# Altium PCB 0.PCB1.PcbDoc (part 7 of 12)
Units mm, origin at the board's own origin, x right, y up, seen from the top; angles counter-clockwise.
Board outline 77 x 72 mm, 6 copper layers (Top Layer, Layer 1, Layer 3, Layer 4, Layer 2, Bottom Layer), stack 1.538 mm thick; 570 components, 490 nets, 3331 pads, 1909 vias.
Unrouted connection lines stored in the file: 2.
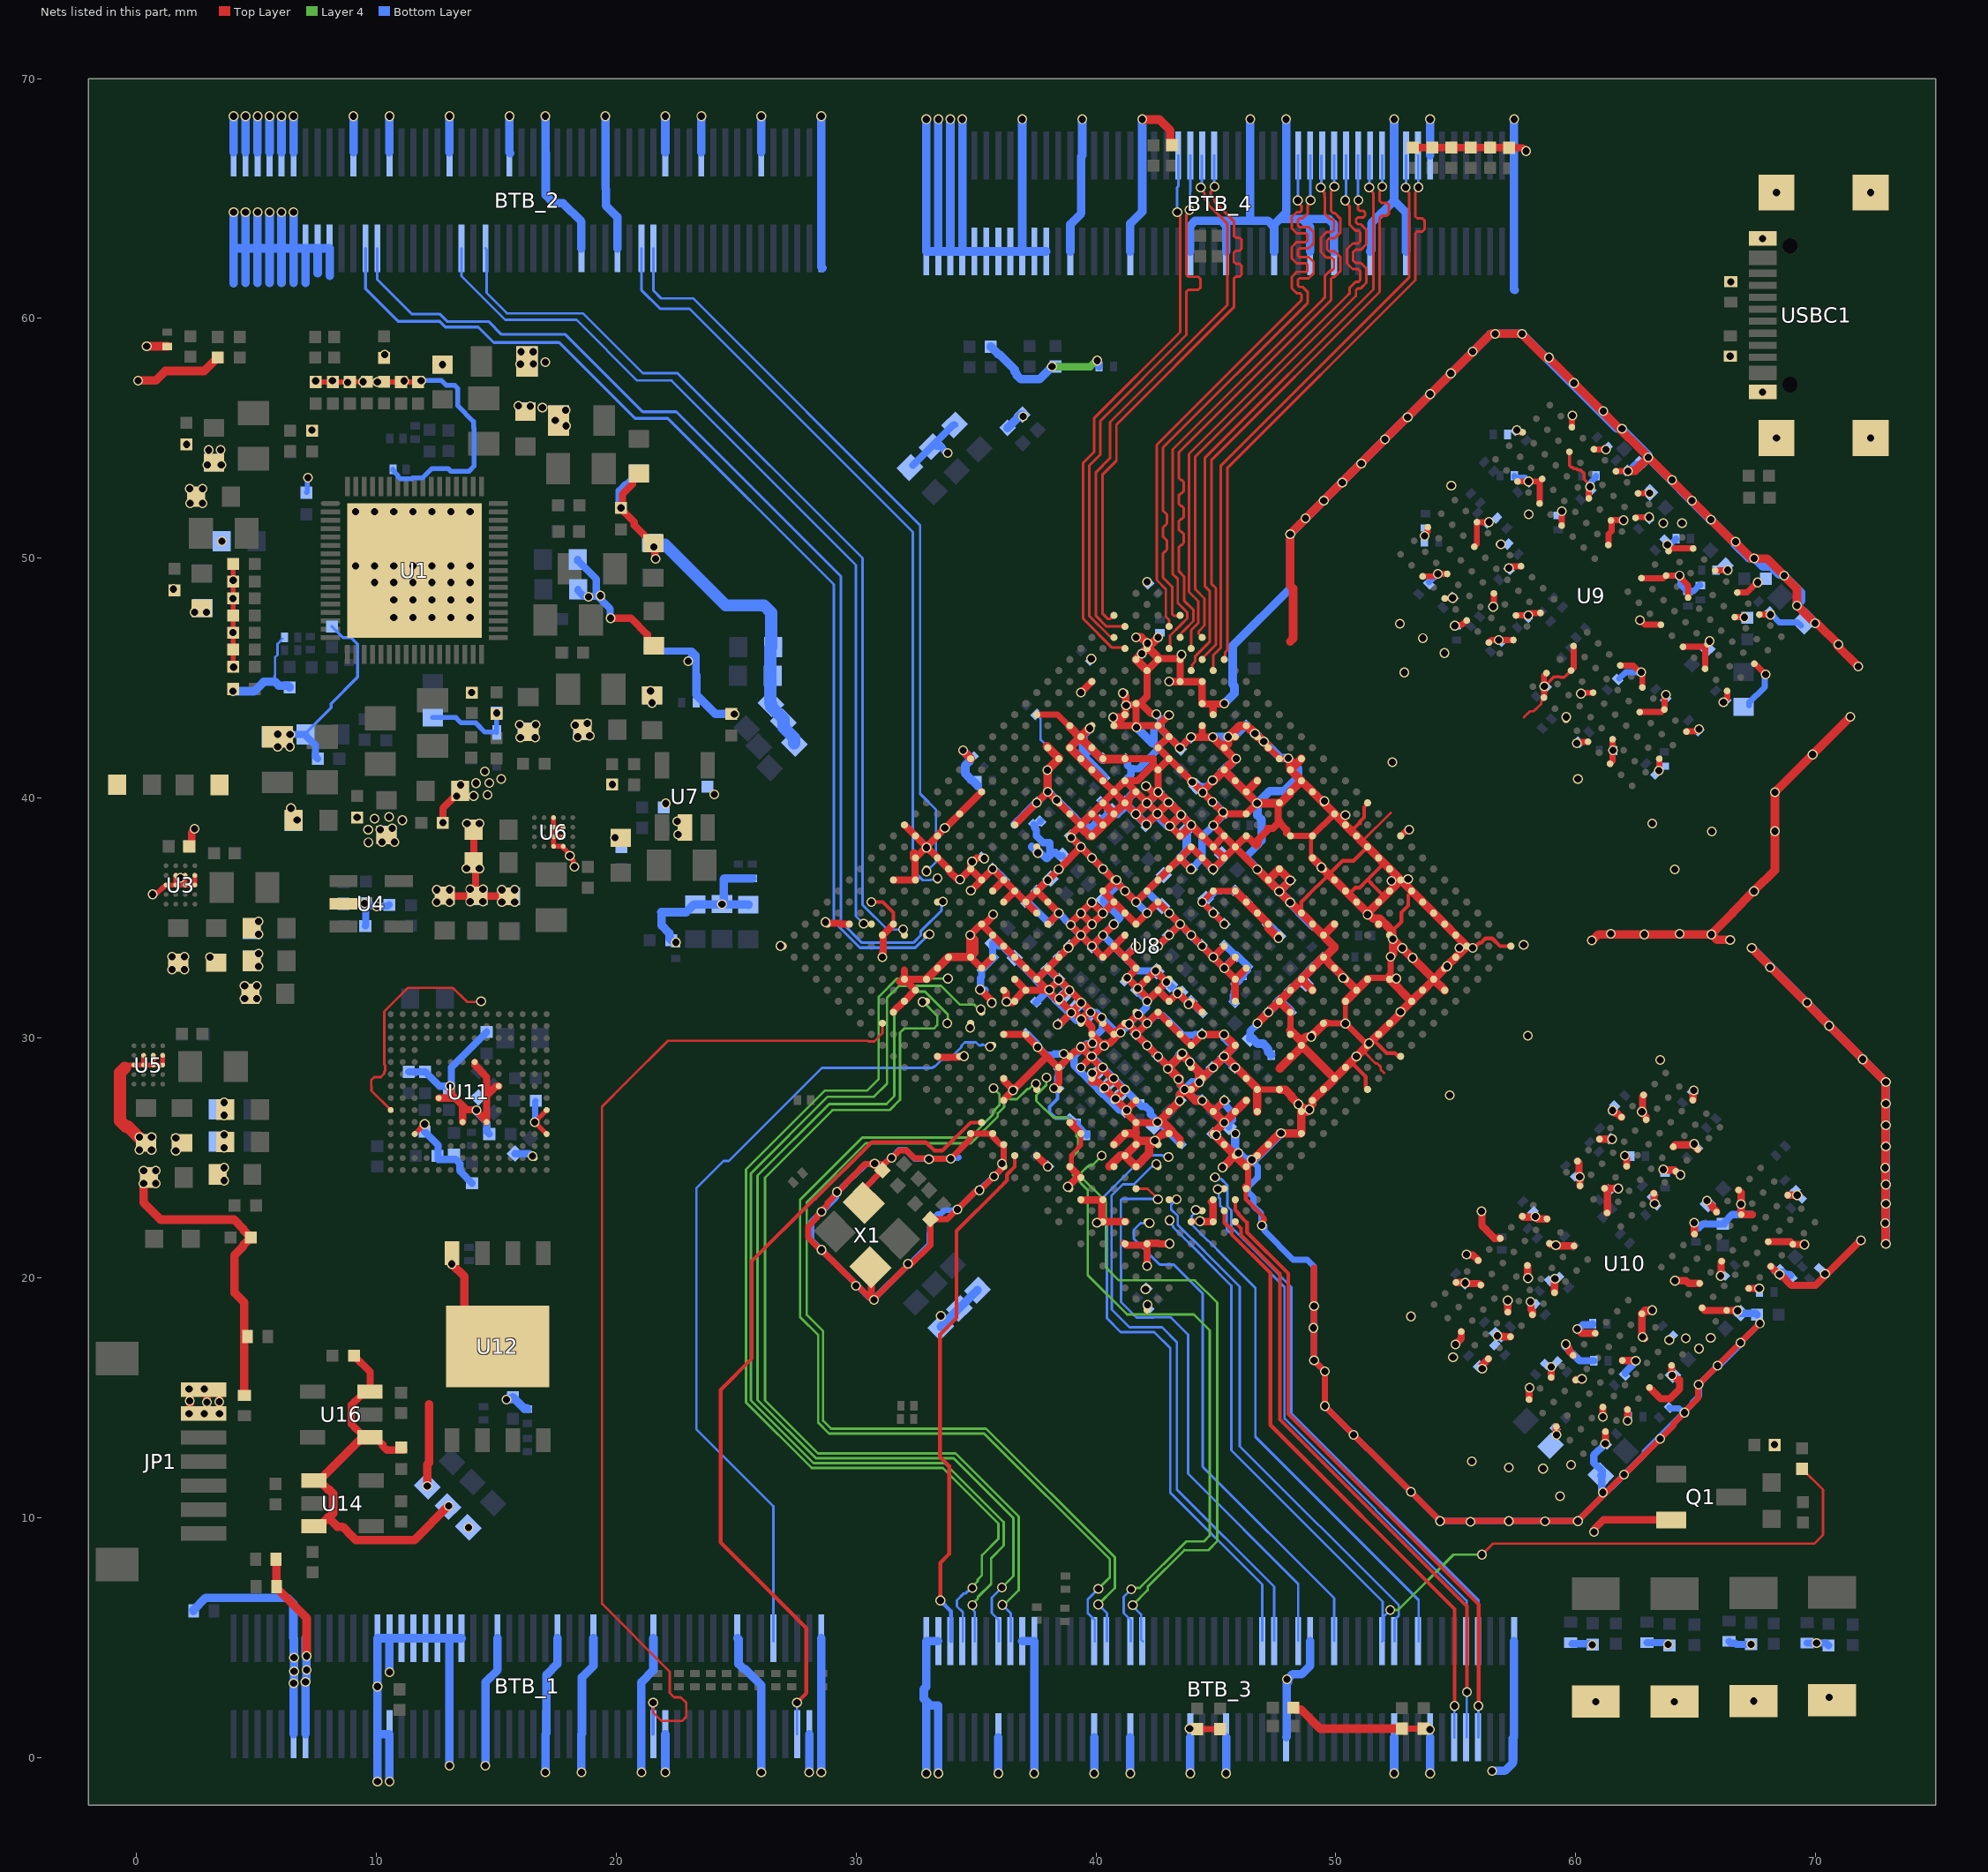
[diagram p11: the nets of this part, all layers, seen from the top]

## Via types
v1: diameter 0.41, hole 0.3, Top Layer to Bottom Layer, tented both sides, 1901 vias
v2: diameter 0.41, hole 0.3, Top Layer to Bottom Layer, 8 vias

## Nets (pads, with @x,y where several pads share a name; then routed paths per layer and width w, separated by ;. In a path a pad name is that pad's centre, name@x,y a point inside that pad or via, vN(x,y) a via of type N, cw(c..) or ccw(c..) an arc to the next point about the centre after c; other vN are vias at no path point) (continued)
GND: (continued)
  Bottom Layer w0.102: 5.765,45.066 5.778,45.079 5.778,45.866 5.879,45.967 5.879,46.431 R40.1@6.088,46.64 ; R54.2@37.501,43.491 37.695,43.297 37.695,42.428 38.318,41.806 38.318,41.499 v1(37.982,41.163)
  Bottom Layer w0.127: 5.765,45.066 5.773,45.058 5.773,44.857 ; C50.2@7.055,42.656 7.055,42.706 8.117,43.768 8.117,43.937 9.224,45.044 9.224,46.414 8.952,46.686 8.62,46.686 R13.1@8.161,47.145
  Bottom Layer w0.142: v1(38.254,27.901) 38.354,27.801 38.399,27.801 38.399,27.455 38.069,27.125 38.069,26.896 38.319,26.646 38.691,26.646 38.714,26.669 38.865,26.669 38.889,26.693 C179.1@38.949,26.634
  Bottom Layer w0.203: C64.1@7.095,52.733 7.122,52.76 7.122,53.326 v1(7.149,53.353) ; R42.1@10.697,53.712 10.697,53.662 10.893,53.465 10.893,53.427 11.012,53.308 11.481,53.308 11.513,53.341 11.922,53.341 12.321,53.739 12.999,53.739 13.113,53.625 13.858,53.625 14.084,53.851 14.084,55.418 14.056,55.446 14.056,55.699 13.387,56.368 13.387,57.085 13.268,57.204 12.925,57.204 12.712,57.417 v1@12.034,57.417 ; C61.2@12.352,43.353 13.319,43.353 13.535,43.137 14.15,43.137 14.535,42.753 15.004,42.753 U2.2@15.019,42.737 v1(15.019,43.545)
  Bottom Layer w0.254: v1(16.602,26.491) 16.624,26.512 16.624,27.358 C395.1@16.645,27.38 ; v1(28.565,22.747) 28.144,22.326 28.144,21.583 29.773,19.954 30.556,19.171 30.603,19.171 30.701,19.073 v1(30.754,19.073) 30.754,19.12 32.163,20.53 v1(32.163,20.577) ; v1@28.565,22.775 28.601,22.811 28.629,22.811 29.168,23.35 29.168,23.537 v1(29.206,23.574) ; v1@29.254,23.608 29.883,24.237 29.897,24.237 ; 29.903,24.255 29.915,24.255 30.39,24.73 30.746,24.73 v1(30.776,24.76) ; v1@30.754,24.737 31.177,24.737 31.442,25.002 v1(31.484,25.002) ; v1@31.494,25.04 31.531,25.077 31.551,25.077 31.795,25.322 32.074,25.322 32.434,24.962 33.018,24.962 v1(33.04,24.941) 33.052,24.953 33.941,24.953 33.979,24.991 34.251,24.991 34.277,25.017 ; v1@32.211,20.53 33.056,21.376 33.056,21.856 33.092,21.892 ; 33.09,21.893 33.09,22.353 33.239,22.502 33.261,22.502 33.403,22.644 33.516,22.644 33.689,22.817 34.199,22.817 v1(34.229,22.847) ; v1@34.23,22.846 34.999,23.615 35.118,23.615 v1(35.148,23.645) 35.732,24.229 v1(35.757,24.229) 36.05,24.522 36.05,24.725 v1(36.088,24.763) ; v1(38.17,57.986) 38.316,57.986 R63.1@38.323,57.993 ; v1(44.427,35.659) v1(44.886,35.2) v1(45.346,34.74) ; C149.1@44.585,35.8 44.691,35.8 45.005,36.113 45.21,36.113 ; 45.404,36.115 45.406,36.114 45.731,36.114 C209.1@45.766,36.149 45.789,36.172 45.821,36.172 C198.1@46.303,35.69 47.584,34.409 47.584,34.189 v1(47.614,34.159) ; v1(46.502,24.915) 46.502,24.873 46.751,24.624 46.751,24.189 46.344,23.782 46.344,23.572 46.563,23.354 46.563,23 46.889,22.674 46.889,22.215 v1(46.919,22.185) ; v1@47.019,22.165 47.019,21.959 48.229,20.75 48.813,20.75 49.092,20.47 v1(49.092,18.819) v1(49.092,16.559) v1(49.55,16.101) 49.55,14.647 v1(50.743,13.452) ; v1@50.764,13.435 51.946,12.253 51.95,12.253 v1(53.131,11.072) v1(54.35,9.853) v1(57.22,9.853) 58.71,9.853 v1(58.72,9.843) ; C334.1@53.893,48.994 v1(54.249,49.35) ; C329.1@57.444,53.439 57.444,53.389 57.467,53.366 57.878,53.366 C335.1@58.008,53.236 ; v1@58.719,9.853 v1(60.091,9.853) 62.871,12.633 62.871,12.735 64.511,14.375 v1(64.536,14.375) ; C299.1@60.599,53.058 60.622,53.058 60.636,53.073 60.636,53.178 60.848,53.389 C325.1@60.848,53.439 ; C302.1@61.818,44.981 62.082,45.246 v1(62.73,45.246) ; v1(62.176,53.634) 62.197,53.634 62.483,53.921 62.632,53.921 C297.1@62.681,53.871 ; v1(63.824,50.567) 63.854,50.597 63.959,50.597 64.112,50.75 64.162,50.75 64.185,50.773 C321.1@64.185,50.823 ; C350.1@63.91,14.586 63.945,14.551 64.317,14.551 64.464,14.405 v1@64.472,14.405 ; v1@64.358,49.223 64.365,49.216 64.365,48.881 64.638,48.609 C303.1@64.688,48.609 ; v1@64.536,14.4 64.866,14.73 64.866,14.781 65.145,15.06 v1@65.145,15.517 ; C303.1@64.739,48.613 64.757,48.632 64.915,48.632 65.146,48.863 C327.1@65.196,48.863 ; v1(65.122,15.541) v1@65.145,15.517 ; v1(65.915,16.335) 65.145,15.564 v1@65.145,15.517 ; v1@65.945,16.305 66.904,17.263 66.904,17.325 67.673,18.093 v1(67.674,18.093) ; C307.1@67.228,43.864 67.228,43.978 67.876,44.626 67.876,45.122 v1(67.914,45.159) ; v1(68.117,47.648) 68.17,47.648 68.489,47.329 69.249,47.329 C322.1@69.387,47.191
  Bottom Layer w0.305: C56.1@5.85,42.565 5.937,42.652 v1(6.408,42.652) ; C56.1@6.077,42.791 6.231,42.637 6.392,42.637 v1(6.408,42.652) ; C60.1@7.559,41.64 7.461,41.738 7.461,42.2 7.055,42.606 C50.2@7.055,42.656 7.053,42.654 6.41,42.654 v1(6.408,42.652) ; C78.1@8.633,35.59 8.643,35.599 9.278,35.599 9.287,35.609 ; 9.287,35.612 9.515,35.612 v1(9.515,35.609) ; R23.1@9.541,34.669 9.557,34.685 C77.1@9.557,35.6 ; C77.1@9.573,35.616 9.671,35.518 9.952,35.518 9.989,35.482 v1(10.017,35.482) 10.037,35.502 10.49,35.502 C80.1@10.538,35.551 ; C392.2@11.351,28.584 C390.2@12.037,28.584 12.632,27.989 13.133,27.989 13.133,28.774 C386.2@14.602,30.243 ; C391.2@12.019,26.091 12.581,25.529 12.581,24.936 13.306,24.936 13.484,24.758 13.484,24.487 13.506,24.464 13.506,24.425 R108.1@13.992,23.939 ; v1(14.178,26.978) 14.198,26.958 14.198,26.882 14.612,26.468 14.612,26.088 C389.2@14.71,25.991 ; C388.2@15.784,25.172 16.387,25.172 16.488,25.071 v1(16.517,25.071) ; C1.2@18.4,49.946 18.4,49.896 19.174,49.121 19.174,48.605 v1(19.341,48.438) ; C62.2@18.41,48.7 18.41,48.65 18.633,48.427 18.683,48.427 18.702,48.408 18.824,48.408 v1(18.844,48.388) ; v1@18.854,48.388 18.874,48.408 19.116,48.408 v1@19.244,48.536 ; v1@19.272,48.369 19.751,47.89 19.751,47.514 v1(19.765,47.5) ; v1(20.201,52.098) 20.201,52.126 20.13,52.197 20.13,52.812 20.399,53.081 20.451,53.081 20.815,53.444 C14.1@20.815,53.516 ; C69.1@21.573,46.351 21.795,46.128 23.151,46.128 ; v1(23.004,45.71) 23.004,45.739 23.151,45.885 23.151,46.128 ; 23.329,45.174 23.329,45.949 23.151,46.128 ; C106.1@32.372,53.869 34.065,55.563 C105.1@34.103,55.563 ; C104.1@33.357,54.669 33.361,54.673 33.503,54.673 33.792,54.384 v1(33.82,54.384) ; v1(35.174,32.013) 35.192,31.995 35.379,31.995 35.381,31.993 35.381,31.976 ; v1@35.174,32.07 35.194,32.09 35.194,32.502 35.234,32.542 C296.1@35.234,32.83 ; v1@35.199,32.039 v1@35.229,32.01 ; C296.1@35.266,32.866 C295.1@35.725,33.324 35.757,33.356 35.757,33.36 35.693,33.424 C164.1@35.693,33.944 35.831,33.944 35.95,33.825 36.098,33.825 C165.1@36.613,33.31 ; v1(35.696,37.038) 35.76,37.038 36.185,36.613 C244.1@36.188,36.613 ; C165.1@36.608,33.335 37.467,32.475 37.467,32.443 37.499,32.411 ; 36.61,38.87 36.586,38.895 36.586,38.898 36.999,39.312 ; 37.032,39.365 37.035,39.365 37.473,39.802 v1(37.537,39.802) 37.992,40.258 v1(37.994,40.258) 38.031,40.258 C219.1@38.415,39.874 ; C294.1@37.11,30.184 37.11,30.18 37.548,29.742 v1@37.548,29.613 ; 37.327,37.996 37.327,37.951 37.419,37.859 v1@37.56,37.859 ; C237.1@37.417,38.894 37.449,38.862 37.449,38.753 37.52,38.682 37.52,38.414 37.795,38.14 38.069,38.14 38.08,38.129 38.08,37.601 ; C242.2@37.496,36.154 C242.2@37.532,36.118 ; C241.1@37.506,31.478 v1@37.969,31.941 ; v1(37.568,29.613) 37.597,29.613 37.93,29.279 38.206,29.279 38.254,29.327 38.645,29.327 v1(38.656,29.339) ; v1(37.579,37.715) v1@37.643,37.779 ; v1@37.595,37.827 37.595,37.824 37.947,37.472 37.951,37.472 38.08,37.601 ; R55.2@37.688,39.038 R55.2@37.688,39.041 ; v1(37.991,36.577) C242.2@37.532,36.118 ; v1(38.059,32.009) 38.037,32.009 v1@37.969,31.941 ; v1(38.254,27.901) 38.254,27.929 38.399,28.074 38.399,28.376 38.434,28.411 38.434,28.702 C183.1@38.466,28.734 ; v1(38.361,39.907) 38.389,39.907 38.506,39.789 38.531,39.789 C220.1@38.947,39.373 39.418,38.902 39.418,38.728 39.438,38.707 ; v1(38.396,30.55) 38.475,30.55 38.918,30.992 39.189,30.72 39.34,30.72 39.383,30.764 v1(39.383,30.769) ; C129.1@38.602,37.59 38.464,37.59 38.324,37.73 38.209,37.73 38.08,37.601 ; v1(38.9,31.978) 38.884,31.978 C170.1@37.976,32.887 ; 38.908,29.224 38.903,29.219 39.089,29.219 ; v1@38.939,34.711 v1(39.83,33.82) 39.83,33.822 41.007,34.999 40.317,35.689 C127.1@40.317,35.773 40.871,36.326 C111.1@40.871,36.469 ; v1(38.947,34.712) 38.942,34.712 38.456,35.199 v1(38.451,35.199) 38.044,34.791 38.04,34.791 C166.1@38.027,34.805 37.172,35.659 37.142,35.659 37.11,35.691 37.106,35.691 C245.1@37.074,35.659 C242.2@37.532,36.118 ; v1(38.968,31.047) 38.948,31.067 38.842,31.067 37.98,31.93 v1@37.969,31.941 ; v1(38.973,38.352) 38.988,38.352 v1(39.376,37.964) v1(39.835,37.504) v1(40.295,37.044) C111.1@40.871,36.469 ; C277.1@39.217,26.439 39.219,26.437 39.219,26.342 39.582,25.979 39.616,25.979 39.618,25.976 C283.1@39.618,25.931 ; v1(39.371,34.281) C170.1@37.976,32.887 ; v1(39.38,29.617) v1@39.433,29.564 ; v1(39.385,31.461) 39.391,31.461 v1(39.784,31.068) ; v1@39.398,30.755 39.533,30.891 39.67,30.891 39.842,31.062 40.022,31.062 C169.1@40.288,30.796 ; v1(39.855,29.773) 39.835,29.753 39.622,29.753 v1@39.433,29.564 ; v1(40.054,58.242) 40.054,58.213 40.129,58.138 40.129,57.988 C230.2@40.131,57.986 ; C221.1@40.237,39.859 40.24,39.859 40.596,39.503 C108.1@40.596,39.469 ; v1(40.289,34.278) 41.197,33.37 ; v1(40.344,29.665) 40.323,29.685 40.049,29.685 39.982,29.753 39.861,29.753 39.844,29.769 39.875,29.8 39.875,29.973 40.268,30.365 40.268,30.776 C169.1@40.288,30.796 ; v1(40.871,36.582) C111.1@40.871,36.469 ; C223.1@41.205,40.71 41.205,40.714 41.465,40.974 C224.1@41.465,41.169 ; R57.2@41.278,41.637 41.31,41.605 41.31,41.374 C224.1@41.465,41.219 ; v1(41.282,26.989) 40.966,26.989 C181.1@39.754,28.201 39.089,28.866 39.089,29.219 ; v1@41.378,30.557 41.378,30.551 41.602,30.328 C135.1@41.602,30.166 ; C224.1@41.468,41.171 C224.1@41.465,41.169 ; v1(41.666,33.814) 41.642,33.814 41.197,33.37 ; v1(41.673,30.148) v1@43.051,28.77 ; v1(41.764,30.97) 41.764,30.967 41.378,30.582 41.378,30.559 v1(41.035,30.216) 41.015,30.236 40.848,30.236 C169.1@40.288,30.796 ; v1(42.133,35.206) v1(41.674,35.666) ; 42.413,42.276 42.413,42.859 42.592,43.037 42.594,43.037 42.722,43.165 ; v1(42.486,32.796) 42.466,32.776 42.388,32.776 42.367,32.796 41.774,32.796 41.671,32.9 C180.1@41.668,32.9 ; v1(42.486,32.796) 43.857,31.426 v1(43.857,31.408) ; v1(42.521,43.496) 42.521,43.468 42.722,43.267 42.722,43.165 ; v1(42.565,26.49) 42.565,26.518 42.272,26.811 42.272,26.944 42.079,27.137 41.916,27.137 41.668,27.385 C136.1@41.665,27.385 v1(41.205,27.844) v1(40.746,28.304) v1(39.827,29.223) 39.806,29.243 39.754,29.243 39.536,29.461 v1@39.433,29.564 ; v1(42.584,33.822) 42.59,33.822 v1(43.51,34.742) ; 42.59,42.099 42.562,42.071 42.562,42.004 42.166,41.607 C266.1@42.166,41.604 42.162,41.604 41.777,41.219 C224.1@41.465,41.219 ; C148.1@42.754,35.494 42.16,36.088 42.16,36.151 ; v1(42.937,32.328) 42.935,32.328 42.13,31.522 v1(42.128,31.522) ; v1@43.029,28.744 43.026,28.742 43.026,28.675 v1@43.45,28.251 ; v1(43.043,43.458) 43.015,43.458 42.722,43.165 ; v1(43.05,35.202) v1(43.51,34.742) ; v1(43.434,28.267) 43.434,28.239 43.511,28.162 43.511,28.033 v1(43.7,27.844) 43.72,27.824 43.755,27.824 44.125,27.453 C292.1@44.428,27.453 ; 43.504,37.493 43.049,37.038 43.047,37.038 42.16,36.151 ; 43.505,37.493 v1(43.965,37.034) 44.422,37.491 44.422,37.493 ; v1(43.962,42.539) 43.96,42.539 v1(43.505,42.084) 42.722,42.867 42.722,43.165 ; v1(43.969,38.872) 44.439,38.403 ; C124.1@44.003,31.561 44.035,31.529 44.035,31.445 C116.1@44.423,31.057 ; C274.1@44.192,40.484 44.635,40.484 44.856,40.705 C262.1@44.859,40.705 44.863,40.705 45.318,41.16 C263.1@45.341,41.16 ; v1(44.425,30.142) 44.134,30.142 44.102,30.11 43.612,30.11 43.545,30.177 C123.1@43.542,30.177 C113.1@43.082,30.637 42.781,30.938 42.464,30.938 v1(42.13,30.603) 41.778,30.956 42.108,31.286 42.108,31.502 v1(42.128,31.522) ; C216.1@44.918,39.765 44.95,39.733 45.007,39.733 C217.1@45.345,39.395 ; C193.1@45.228,37.614 45.348,37.494 44.888,37.033 v1(44.882,37.033) 44.422,37.493 ; v1(45.347,27.386) 45.347,27.238 45.689,26.897 45.689,26.574 45.538,26.423 C282.1@45.538,26.285 ; C217.1@45.379,39.361 45.38,39.357 44.887,38.864 v1(44.887,38.859) 44.887,38.851 44.439,38.403 ; C214.1@45.381,33.856 45.385,33.856 C213.1@45.767,33.474 ; C206.1@45.765,31.481 45.733,31.512 45.733,31.77 45.765,31.803 45.765,31.932 45.8,31.967 45.8,32.258 C205.1@45.832,32.29 45.864,32.322 45.902,32.322 46.146,32.566 C202.1@46.146,32.611 46.146,32.657 46.315,32.825 46.315,32.942 46.347,32.974 46.347,32.977 C191.1@46.315,33.009 45.85,33.474 C213.1@45.767,33.474 ; C201.1@46.427,29.968 46.427,30.27 46.73,30.573 v1(46.73,30.61) ; 46.73,38.047 46.73,38.019 46.325,37.614 46.325,37.509 46.305,37.489 47.644,36.15 v1(47.644,36.11) ; v1@59.557,17.143 60.167,16.533 C346.1@60.756,16.533 ; U17.1@59.842,4.741 60.662,4.741 C400.1@60.709,4.694 ; v1@60.065,17.879 60.136,17.879 60.292,18.035 60.703,18.035 60.705,18.037 C357.1@60.705,18.083 ; C366.1@61.051,11.753 61.087,11.718 61.087,11.131 61.132,11.086 v1(61.132,11.047) ; C366.1@61.107,11.733 61.107,11.936 60.751,12.291 60.751,12.594 v1(61.235,13.079) ; C369.1@62.072,16 62.072,16.062 62.504,16.494 v1(62.504,16.533) ; U20.1@62.97,4.788 63.783,4.788 C401.1@63.91,4.661 ; C363.1@65.135,22.093 65.283,22.241 C342.1@66.136,22.241 ; C342.1@66.212,22.248 66.212,22.317 66.529,22.634 67.355,22.634 ; U21.1@66.399,4.839 66.472,4.766 66.646,4.766 66.7,4.712 v1(67.313,4.712) ; v1(66.753,18.624) 66.759,18.624 66.868,18.516 67.506,18.516 C341.1@67.558,18.464 ; v1(68.498,20.14) 68.586,20.228 68.648,20.228 68.736,20.14 68.904,20.14 C384.1@68.955,20.089 ; U22.1@69.65,4.769 v1(70.041,4.769) 70.431,4.769 C403.1@70.539,4.661 ; 37.499,32.411 v1@37.969,31.941 ; 37.499,32.411 37.5,32.411 C170.1@37.976,32.887 ; 39.089,29.219 v1@39.433,29.564 ; C111.1@40.871,36.469 v1(41.214,36.125) v1(41.674,35.666) ; 41.197,33.37 C180.1@41.668,32.9 ; C224.1@41.465,41.169 C224.1@41.465,41.219 ; C180.1@41.668,32.9 41.683,32.884 41.683,32.881 v1(41.303,32.501) 41.677,32.127 41.677,32.002 42.128,31.55 v1(42.128,31.522) ; v1@41.674,35.666 42.16,36.151 ; v1(43.51,34.742) 43.963,34.289 v1(44.889,33.363) v1(45.349,32.904) 45.349,32.932 45.767,33.351 C213.1@45.767,33.474 ; 44.422,37.493 44.422,38.387 44.439,38.403
  Bottom Layer w0.356: U23.1@2.383,6.101 2.383,6.151 2.888,6.656 6.295,6.656 6.547,6.404 6.547,4.973 BTB_1.6@6.551,4.97 6.564,4.956 BTB_1.6@6.564,4.149 ; v1(4.031,44.458) 4.922,44.458 5.313,44.849 5.765,44.849 5.773,44.857 5.939,44.691 6.311,44.691 R15.1@6.383,44.619 ; v1(4.051,64.431) BTB_2.100@4.051,62.92 ; BTB_2.1@4.051,66.92 v1(4.051,68.431) ; 4.058,61.468 4.051,61.476 BTB_2.100@4.051,62.92 ; 4.551,61.476 BTB_2.99@4.551,62.92 ; v1(4.551,64.431) BTB_2.99@4.551,62.92 ; BTB_2.2@4.551,66.92 v1(4.551,68.431) ; 5.051,61.476 BTB_2.98@5.051,62.92 ; v1(5.051,64.431) BTB_2.98@5.051,62.92 ; BTB_2.3@5.051,66.92 v1(5.051,68.431) ; 5.551,61.476 BTB_2.97@5.551,62.92 ; v1(5.551,64.431) BTB_2.97@5.551,62.92 ; BTB_2.4@5.551,66.92 v1(5.551,68.431) ; 6.051,61.476 BTB_2.96@6.051,62.92 ; v1(6.051,64.431) BTB_2.96@6.051,62.92 ; BTB_2.5@6.051,66.92 v1(6.051,68.431) ; BTB_1.95@6.551,0.97 6.552,0.971 6.552,3.093 v1(6.554,3.094) ; 6.551,61.476 BTB_2.95@6.551,62.92 ; v1(6.551,64.431) BTB_2.95@6.551,62.92 ; BTB_2.6@6.551,66.92 v1(6.551,68.431) ; v1@6.556,3.102 6.568,3.114 v1@6.568,3.594 ; BTB_1.6@6.567,4.147 6.567,3.602 v1(6.574,3.595) ; BTB_1.94@7.051,0.97 7.051,3.159 7.086,3.194 7.086,3.632 v1(7.096,3.643) 7.086,3.653 7.086,4.19 7.051,4.224 BTB_1.7@7.051,4.97 ; 7.051,61.476 BTB_2.94@7.051,62.92 ; 7.558,61.887 7.558,62.913 BTB_2.93@7.551,62.92 ; 8.064,61.773 8.064,62.907 BTB_2.92@8.051,62.92 BTB_2.93@7.551,62.92 ; BTB_2.11@9.051,66.92 v1(9.051,68.431) ; v1(10.051,-1.01) BTB_1.88@10.051,0.97 ; v1(10.551,-1.007) BTB_1.87@10.551,0.97 BTB_1.88@10.051,0.97 ; v1(10.551,3.549) BTB_1.14@10.551,4.97 ; BTB_2.14@10.551,66.92 v1(10.551,68.431) ; v1(13.051,-0.344) BTB_1.19@13.051,4.97 ; BTB_2.19@13.051,66.92 v1(13.051,68.431) ; BTB_1.20@13.551,4.97 BTB_1.19@13.051,4.97 ; v1(14.551,-0.344) 14.551,3.132 15.051,3.632 BTB_1.23@15.051,4.97 ; v1(15.422,14.92) 15.437,14.92 15.465,14.948 15.619,14.948 C397.1@15.691,15.02 16.162,14.55 16.279,14.55 16.301,14.527 C396.1@16.301,14.522 ; v1(15.551,68.431) BTB_2.24@15.551,66.92 BTB_2.24@15.582,66.889 ; v1(17.051,-0.618) BTB_1.74@17.051,0.97 17.093,1.012 17.093,3.44 17.551,3.897 BTB_1.28@17.551,4.97 ; v1(17.051,68.431) BTB_2.27@17.051,66.92 17.063,66.908 17.063,65.141 17.401,64.803 17.784,64.803 18.551,64.036 BTB_2.71@18.551,62.92 ; v1(18.551,-0.618) BTB_1.71@18.551,0.97 18.574,0.992 18.574,3.337 19.051,3.815 BTB_1.31@19.051,4.97 ; v1(19.551,68.431) 19.551,65.411 19.571,65.391 19.571,64.706 20.051,64.226 BTB_2.68@20.051,62.92 ; v1(21.051,-0.618) BTB_1.66@21.051,0.97 21.051,3.137 21.551,3.637 BTB_1.36@21.551,4.97 ; v1(22.051,-0.618) BTB_1.64@22.051,0.97 ; BTB_2.37@22.051,66.92 v1(22.051,68.431) ; C279.1@22.292,34.075 22.22,34.147 22.22,34.365 21.897,34.687 21.891,34.687 21.888,34.691 21.888,35.235 21.884,35.238 22.922,35.238 23.251,35.568 C161.1@23.301,35.568 23.308,35.561 25.504,35.561 C163.1@25.511,35.554 ; 23.342,45.131 23.342,44.303 24.142,43.503 v1(24.926,43.503) ; BTB_2.40@23.551,66.92 v1(23.551,68.431) ; v1(24.414,35.577) 24.486,35.648 24.486,36.625 24.51,36.649 25.682,36.649 C264.1@25.684,36.651 ; BTB_1.43@25.051,4.97 25.104,4.917 25.104,3.897 25.31,3.69 25.359,3.69 26.051,2.999 BTB_1.56@26.051,0.97 v1(26.051,-0.618) ; BTB_2.45@26.051,66.92 v1(26.051,68.431) ; v1(28.051,-0.618) BTB_1.52@28.051,0.97 ; v1(28.551,-0.618) BTB_1.51@28.551,0.97 BTB_1.50@28.551,4.97 ; v1(28.551,68.431) BTB_2.50@28.551,66.92 BTB_2.51@28.551,62.92 28.551,62.151 BTB_2.51@28.604,62.098 ; v1(32.931,-0.668) BTB_3.100@32.931,0.843 32.931,2.343 ; v1(32.931,68.304) BTB_4.1@32.931,66.793 BTB_4.100@32.931,62.793 BTB_4.99@33.431,62.793 ; v1(33.431,-0.668) BTB_3.99@33.431,0.843 33.431,2.16 33.113,2.16 32.931,2.343 ; BTB_3.2@33.431,4.843 BTB_3.1@32.931,4.843 32.931,2.946 32.83,2.845 32.83,2.444 32.931,2.343 ; v1(33.431,68.304) BTB_4.2@33.431,66.793 BTB_4.99@33.431,62.793 ; C141.1@33.531,17.944 33.531,17.95 35.056,19.475 C143.1@35.056,19.48 ; v1(33.931,68.304) BTB_4.3@33.931,66.793 BTB_4.98@33.931,62.793 ; v1(34.431,68.304) BTB_4.4@34.431,66.793 BTB_4.97@34.431,62.793 ; v1(34.461,41.986) 34.461,41.971 34.719,41.713 34.719,41.527 34.553,41.362 34.553,41.023 35.084,40.493 ; R17.1@35.614,58.82 35.935,58.499 35.98,58.499 36.613,57.866 36.613,57.775 36.701,57.687 36.701,57.627 36.865,57.463 37.648,57.463 v1(38.17,57.986) ; v1(35.931,-0.668) BTB_3.94@35.931,0.843 ; C257.1@36.318,55.437 36.849,55.967 36.918,55.967 v1(36.966,55.918) ; BTB_4.93@36.484,62.793 BTB_4.92@36.931,62.793 ; C267.1@36.927,55.985 C267.1@36.933,55.985 ; BTB_3.9@36.931,4.843 BTB_3.10@37.431,4.843 BTB_3.91@37.431,0.843 v1(37.431,-0.668) ; v1(36.931,68.304) BTB_4.9@36.931,66.793 BTB_4.92@36.931,62.793 ; BTB_4.90@37.931,62.793 BTB_4.91@37.431,62.793 BTB_4.92@36.931,62.793 ; BTB_4.88@38.931,62.793 38.931,63.92 39.39,64.379 39.39,66.752 BTB_4.14@39.431,66.793 v1(39.431,68.304) ; 39.519,38.756 39.817,38.756 40.061,39 C107.1@40.164,39 40.189,39 40.608,39.419 40.608,39.458 C108.1@40.596,39.469 ; v1(39.748,42.902) 39.748,42.887 39.469,42.609 39.469,41.768 ; v1(39.931,-0.668) BTB_3.86@39.931,0.843 ; C222.1@40.264,41.607 39.804,42.067 39.783,42.067 39.484,41.768 39.469,41.768 ; C228.1@40.337,40.9 39.469,41.768 ; C108.1@40.69,39.339 40.695,39.335 40.888,39.335 41.155,39.602 41.155,39.623 41.239,39.706 ; C229.1@41.142,39.8 41.236,39.706 41.239,39.706 ; v1(41.431,-0.668) BTB_3.83@41.431,0.843 ; BTB_4.83@41.431,62.793 41.431,63.951 41.931,64.451 BTB_4.19@41.931,66.793 v1(41.931,68.304) ; 41.528,40.176 41.528,40.162 41.266,39.9 41.266,39.733 ; v1(41.697,42.95) 42.371,42.276 42.413,42.276 ; v1(42.563,39.352) v1@42.517,39.306 ; v1(42.565,26.49) 42.575,26.48 42.659,26.48 C285.1@43.089,26.049 C278.1@43.546,25.592 ; v1(42.993,28.711) 42.993,28.726 43.394,29.127 43.394,29.149 C145.1@43.473,29.229 ; C145.1@43.473,29.26 C145.1@43.477,29.256 ; C145.1@43.473,29.29 43.536,29.353 43.614,29.353 43.664,29.302 43.664,29.247 v1@43.93,28.98 ; v1(43.499,27.379) 43.499,27.628 43.7,27.829 v1(43.7,27.844) 43.715,27.844 44.01,28.139 44.277,28.139 44.286,28.148 44.286,28.166 44.463,28.343 ; 43.505,37.493 43.505,37.508 43.791,37.793 C256.1@43.791,38.691 ; v1(43.546,39.296) v1(43.082,38.833) 43.072,38.843 42.979,38.843 v1@42.517,39.306 ; v1(43.923,28.976) 43.923,28.964 44.463,28.424 44.463,28.343 ; v1(43.931,-0.668) BTB_3.78@43.931,0.843 ; BTB_4.78@43.931,62.793 43.931,63.864 44.139,64.073 45.222,64.073 ; v1(43.969,38.872) v1(43.026,39.815) v1(42.591,40.251) 41.671,39.332 v1(41.667,39.332) ; v1(44.88,42.538) 44.887,42.545 45.506,42.545 45.524,42.563 45.753,42.563 C239.1@46.231,43.042 46.262,43.042 46.6,42.705 46.622,42.705 v1(46.632,42.694) ; v1(45.343,30.137) 45.353,30.127 45.353,30.011 45.737,29.627 45.737,29.612 45.732,29.612 44.463,28.343 ; v1(45.345,29.222) v1(45.804,28.763) ; v1(45.347,43.938) 45.773,44.364 45.773,44.666 45.702,44.737 45.702,46.343 48.102,48.743 v1(48.102,51.001) v1(49.499,52.398) 56.44,59.34 56.631,59.34 v1(56.649,59.358) v1(57.767,59.358) 61.711,55.413 61.914,55.413 v1(61.932,55.395) 63.006,54.321 63.006,54.219 v1(63.024,54.201) 65.628,51.598 65.653,51.598 66.554,50.697 66.658,50.697 v1(66.668,50.687) ; v1(45.431,-0.668) BTB_3.75@45.431,0.843 ; BTB_4.75@45.431,62.793 45.431,63.864 45.222,64.073 ; v1(45.809,26.011) 45.799,26.001 45.799,25.363 45.945,25.217 v1(45.945,25.202) 45.96,25.202 46.236,24.926 46.491,24.926 v1(46.502,24.915) 46.512,24.926 46.619,24.926 v1(47.716,26.023) ; v1(45.851,41.639) 45.837,41.639 45.566,41.368 45.527,41.368 45.341,41.183 45.341,41.16 45.762,40.739 45.765,40.739 45.765,40.738 v1(46.72,39.781) v1(46.72,39.781) ; C201.1@46.427,29.968 46.529,29.968 46.739,29.758 46.974,29.758 47.131,29.601 47.131,29.576 47.187,29.521 47.187,29.408 47.307,29.289 C204.1@47.312,29.289 ; v1(46.431,68.304) BTB_4.28@46.431,66.793 46.431,64.103 46.401,64.073 ; v1@46.649,42.688 46.653,42.688 46.985,42.355 v1(46.999,42.355) 47.683,41.672 48.005,41.672 v1(48.015,41.661) 48.015,41.647 48.424,41.238 48.424,40.871 47.848,40.295 47.249,40.295 46.735,39.781 v1(46.72,39.781) ; 46.73,38.047 46.73,38.062 46.905,38.237 46.905,39.106 46.73,39.281 46.73,39.771 v1(46.72,39.781) ; v1(47.187,31.065) 47.609,31.487 47.609,31.52 47.613,31.524 47.613,31.555 C187.1@47.609,31.559 ; BTB_4.71@47.431,62.793 47.431,63.919 ; BTB_3.70@47.931,0.843 47.957,0.869 47.957,3.094 48.003,3.14 v1@48.003,3.264 ; v1(47.931,68.304) BTB_4.31@47.931,66.793 47.931,64.419 47.654,64.143 ; v1(47.967,3.262) 47.97,3.264 v1@48.003,3.264 ; v1(48.102,36.569) v1(48.102,36.569) v1(47.644,36.11) 47.656,36.11 48.104,35.663 v1(48.104,35.651) 48.104,35.611 48.471,35.243 48.471,35.219 C199.1@48.99,34.701 ; C192.1@48.139,31.099 47.714,31.524 47.645,31.524 49.478,33.357 C190.1@49.485,33.357 ; BTB_3.33@48.931,4.843 48.931,3.822 48.581,3.473 48.211,3.473 v1@48.003,3.264 ; BTB_4.68@48.931,62.793 48.931,63.813 48.602,64.143 ; BTB_4.66@49.931,62.793 49.921,62.803 49.921,63.934 49.713,64.143 48.602,64.143 ; BTB_4.63@51.431,62.793 51.484,62.846 51.484,63.964 52.431,64.911 ; v1(52.431,-0.668) BTB_3.61@52.431,0.843 ; v1(52.431,68.304) BTB_4.40@52.431,66.793 52.431,64.911 ; BTB_4.60@52.931,62.793 52.931,64.411 52.431,64.911 ; v1(53.931,-0.668) BTB_3.58@53.931,0.843 ; BTB_4.43@53.931,66.793 v1(53.931,68.304) ; v1(56.519,-0.564) 57.045,-0.564 57.378,-0.23 57.378,0.79 BTB_3.51@57.431,0.843 BTB_3.50@57.431,4.843 ; v1(57.431,68.304) 57.431,66.056 BTB_4.51@57.431,62.793 57.431,61.207 57.459,61.179 ; v1@66.603,50.622 67.215,50.011 67.417,50.011 v1(67.435,49.993) 67.46,49.993 67.807,49.647 68.153,49.647 68.477,49.323 68.64,49.323 69.389,48.573 69.389,48.222 69.222,48.055 v1(69.222,48.029) 69.235,48.029 C322.1@69.978,47.286 ; v1(67.342,33.754) v1(72.93,28.166) v1(72.93,27.265) v1(72.93,26.363) v1(72.93,25.474) v1(72.93,23.887) v1(72.93,23.086) v1(72.93,21.41) ; v1@71.775,45.489 v1(71.787,45.489) ; BTB_2.100@4.051,62.92 BTB_2.99@4.551,62.92 ; BTB_2.99@4.551,62.92 BTB_2.98@5.051,62.92 ; BTB_2.98@5.051,62.92 BTB_2.97@5.551,62.92 ; BTB_2.97@5.551,62.92 BTB_2.96@6.051,62.92 ; BTB_2.96@6.051,62.92 BTB_2.95@6.551,62.92 ; BTB_2.95@6.551,62.92 BTB_2.94@7.051,62.92 ; BTB_2.94@7.051,62.92 BTB_2.93@7.551,62.92 ; BTB_1.88@10.051,0.97 v1(10.051,2.956) BTB_1.13@10.051,4.97 BTB_1.14@10.551,4.97 ; BTB_1.14@10.551,4.97 BTB_1.15@11.051,4.97 BTB_1.18@12.551,4.97 BTB_1.19@13.051,4.97 ; BTB_4.99@33.431,62.793 BTB_4.98@33.931,62.793 ; BTB_4.98@33.931,62.793 BTB_4.97@34.431,62.793 ; BTB_4.97@34.431,62.793 BTB_4.95@35.431,62.793 BTB_4.94@35.931,62.793 BTB_4.92@36.931,62.793 ; 41.239,39.706 41.266,39.733 ; 41.266,39.733 v1(41.667,39.332) ; v1(41.667,39.332) v1(42.105,38.894) v1@42.517,39.306 ; 45.222,64.073 46.401,64.073 ; 46.401,64.073 47.172,64.073 47.378,63.866 47.654,64.143 ; 47.654,64.143 48.602,64.143
  Bottom Layer w0.508: v1(21.577,50.473) C6.1@21.577,50.563 ; C159.1@27.423,42.281 27.423,42.502 26.974,42.951 C158.1@26.974,43.172 26.974,43.295 26.461,43.809 C160.1@26.461,43.932 26.425,43.967 26.425,45.09 26.436,45.101 26.43,45.106 26.43,46.262 26.461,46.292 26.461,47.736 26.163,48.033 24.57,48.033 22.04,50.563 C6.1@21.577,50.563 ; C6.1@21.577,50.563 C6.1@21.496,50.643 C6.1@21.577,50.563
  other v1: 60.839,2.324 64.115,2.324 67.417,2.349 70.567,2.503 7.051,3.145 6.573,4.154 60.687,4.69 63.859,4.705 13.842,9.589 55.62,9.828 59.354,10.894 62.014,11.793 58.643,12.037 57.22,12.088 59.811,12.19 55.671,12.342 63.529,13.285 2.196,14.325 2.831,14.325 3.466,14.325 49.55,14.654 2.946,14.812 3.456,14.825 2.227,14.857 2.196,15.361 2.831,15.361 54.889,16.684 65.145,17.041 66.872,17.295 64.586,17.473 65.628,17.498 49.067,17.905 53.131,18.387 33.537,18.405 42.154,18.872 42.071,19.52 29.992,19.657 70.39,20.165 42.13,20.496 43.074,21.417 71.889,21.562 72.905,22.274 0.807,23.925 3.652,24.052 64.364,24.286 0.299,24.458 0.807,24.458 3.652,24.585 72.905,24.585 33.954,24.966 1.645,25.296 0.121,25.322 0.629,25.322 3.652,25.423 61.513,25.779 1.645,25.83 0.629,25.855 3.652,25.957 45.35,26.471 3.652,26.769 48.897,27.01 3.652,27.303 54.757,27.608 39.842,28.527 39.373,28.77 44.886,28.764 63.52,29.081 71.965,29.106 42.592,29.229 42.132,29.689 58,30.087 34.758,30.426 70.568,30.503 69.654,31.468 4.514,31.632 5.022,31.632 4.514,32.166 5.022,32.166 52.522,32.476 50.299,32.5 1.491,32.852 1.999,32.852 68.104,32.942 5.091,32.979 3.066,33.36 31.097,33.36 53.203,33.338 1.491,33.385 1.999,33.385 5.091,33.512 38.852,33.76 52.771,33.745 55.154,33.758 26.846,33.835 57.83,33.881 22.488,33.98 43.053,34.287 5.091,34.325 61.462,34.339 64.332,34.339 5.091,34.858 51.323,35.142 12.516,35.659 13.05,35.659 15.234,35.659 15.768,35.659 13.913,35.685 14.447,35.685 34.785,36.139 12.516,36.167 13.05,36.167 15.234,36.167 15.768,36.167 13.913,36.193 14.447,36.193 52.318,36.548 34.33,36.599 53.011,36.622 1.836,36.673 64.129,37.031 13.761,37.056 14.294,37.056 34.843,37.347 18.066,37.593 32.938,37.938 9.672,38.154 10.244,38.16 10.752,38.16 19.947,38.347 22.582,38.484 65.679,38.606 9.665,38.682 10.165,38.686 10.662,38.735 13.783,38.936 14.294,38.936 63.189,38.936 22.541,39.026 6.7,39.086 11.081,39.078 9.928,39.137 9.203,39.191 10.538,39.22 50.4,39.29 45.301,39.422 6.446,39.571 22.064,39.774 42.124,39.791 44.851,39.835 49.524,39.876 14.056,40.089 14.637,40.13 24.092,40.153 44.444,40.237 13.514,40.547 19.84,40.564 14.165,40.62 14.706,40.633 44.018,40.661 44.866,40.742 15.206,40.8 60.091,40.79 14.523,41.113 52.356,41.489 5.893,42.139 6.392,42.147 16.01,42.529 16.62,42.529 18.4,42.552 18.898,42.604 5.892,42.662 15.985,43.062 16.645,43.062 18.295,43.041 18.79,43.112 21.502,43.968 13.978,44.395 21.434,44.463 52.852,45.235 4.051,45.459 39.809,45.806 43.574,45.974 41.908,46.013 54.528,46.048 53.625,46.669 4.031,46.898 52.674,47.267 10.727,47.533 11.523,47.533 12.319,47.533 13.114,47.533 13.91,47.533 2.421,47.746 2.925,47.746 10.727,48.261 11.523,48.261 12.319,48.261 13.114,48.261 13.91,48.261 4.031,48.32 1.538,48.711 9.931,48.989 10.727,48.989 11.523,48.989 12.319,48.989 13.114,48.989 13.91,48.989 42.133,49.02 9.135,49.673 9.931,49.673 10.727,49.673 11.523,49.673 12.319,49.673 13.114,49.673 13.91,49.673 3.562,50.708 63.647,51.465 64.433,51.457 65.641,51.611 58.041,51.834 9.135,51.938 9.931,51.938 10.727,51.938 11.523,51.938 12.319,51.938 13.114,51.938 13.91,51.938 2.243,52.29 2.751,52.29 64.853,52.398 2.218,52.899 2.751,52.896 54.814,53.027 50.274,53.16 64.015,53.262 2.954,53.893 3.535,53.893 51.061,53.947 3.014,54.506 3.514,54.517 2.091,54.746 52.052,54.963 68.371,55.01 72.301,55.01 7.323,55.342 17.914,55.517 17.459,55.753 52.991,55.878 61.145,56.132 17.899,56.178 16.926,56.284 16.42,56.332 15.921,56.359 53.931,56.843 67.796,56.93 59.926,57.3 8.804,57.324 8.173,57.399 11.167,57.393 54.795,57.707 12.759,58.076 16.006,58.095 16.545,58.103 17.043,58.179 58.884,58.367 66.441,58.424 10.353,58.484 16.035,58.607 16.542,58.606 55.709,58.621 66.466,61.529 67.796,63.33 68.371,65.25 72.301,65.25
GPIO0_A0: BTB_3.3 U8.P33 | length 22
  Top Layer w0.156: v1@33.501,6.555 33.518,6.572 33.518,8.115 33.88,8.478 33.88,12.149 33.499,12.53 33.499,17.628 34.19,18.319 34.19,21.95 35.974,23.734 36.295,24.056 36.295,24.306 36.615,24.626 U8.P33@36.615,25.093
  Bottom Layer w0.156: v1(33.518,6.539) 33.955,6.101 BTB_3.3@33.955,4.843
GPIO0_B2: BTB_3.19 U8.K29 | length 27.1
  Layer 4 w0.102: v1(40.242,25.087) 40.242,25.071 39.856,24.684 39.706,24.684 39.643,24.622 39.634,24.622 39.395,24.383 39.395,24.189 40.416,23.169 40.416,20.428 40.953,19.891 44.127,19.891 45.059,18.959 45.059,9.012 44.686,8.639 43.695,8.639 ; v1(41.535,6.348) 42.158,6.971 42.158,7.111 43.69,8.643
  Bottom Layer w0.102: v1(41.535,6.348) 41.517,6.329 41.881,5.965 41.881,4.917 BTB_3.19@41.955,4.843
GPIO0_B7: BTB_3.18 U8.T28 | length 31.1
  Layer 4 w0.102: v1(37.939,28.346) 37.927,28.335 37.927,28.022 37.516,27.61 37.516,27.377 37.871,27.021 37.879,27.021 38.235,26.666 38.842,26.666 39.186,26.322 39.186,25.892 39.255,25.824 39.255,25.276 39.035,25.057 39.035,24.516 39.037,24.515 39.037,24.275 39.659,23.653 39.659,20.11 41.3,18.469 43.027,18.469 44.084,18.469 44.744,17.808 44.744,9.246 44.503,9.005 43.764,9.005 41.827,7.067 41.531,7.067 v1(41.472,7.008)
  Bottom Layer w0.102: BTB_3.18@41.455,4.843 41.455,5.718 41.158,6.014 41.158,6.694 v1(41.472,7.008)
GPIO0_C6: BTB_3.16 U8.T29 | length 39.7
  Layer 4 w0.102: v1(37.5,28.086) 37.425,28.086 37.21,27.871 37.138,27.871 36.706,27.439 36.433,27.439 36.41,27.462 36.232,27.462 36.172,27.402 36.172,27.113 35.91,26.851 35.91,26.725 34.786,25.601 34.106,25.601 30.398,25.601 27.947,23.15 27.947,18.451 28.629,17.769 28.629,14.038 28.958,13.709 35.421,13.709 40.787,8.343 40.787,7.059 v1(40.101,6.373)
  Bottom Layer w0.102: v1(40.101,6.373) 40.455,6.019 BTB_3.16@40.455,4.843
GPIO0_C7: BTB_3.15 U8.V31 | length 38.9
  Layer 4 w0.102: v1(35.732,27.907) 35.732,27.904 35.979,27.656 35.979,27.193 35.704,26.918 35.704,26.792 34.754,25.842 33.865,25.842 30.261,25.842 27.668,23.249 27.668,18.363 28.425,17.605 28.425,13.954 28.874,13.506 35.337,13.506 40.583,8.259 40.583,7.516 v1(40.101,7.034)
  Bottom Layer w0.102: BTB_3.15@39.955,4.843 39.955,5.718 39.658,6.014 39.658,6.591 v1(40.101,7.034)
GPIO0_D3: BTB_1.53 U8.U33 | length 34.1
  Top Layer w0.156: v1(27.541,2.288) 27.927,2.674 27.927,5.39 24.358,8.959 24.358,15.324 25.658,16.625 25.658,20.693 28.256,23.29 28.29,23.29 30.652,25.652 32.912,25.652 33.266,25.298 33.599,25.298 34.773,26.471 U8.U33@35.236,26.471
  Bottom Layer w0.102: BTB_1.53@27.535,0.98 v1@27.535,2.282
GPIO1_A2: BTB_3.55 U8.A26 | length 25.5
  Top Layer w0.156: U8.A26@45.807,22.335 45.807,22.296 46.048,22.055 46.048,21.782 47.665,20.165 47.665,14.095 55.469,6.29 v1(55.469,2.727)
  Bottom Layer w0.102: BTB_3.55@55.455,0.843 v1@55.455,2.712
GPIO1_A4: BTB_3.54 U8.B25 | length 26.6
  Top Layer w0.156: U8.B25@45.807,23.254 45.807,22.816 45.947,22.676 45.947,22.647 46.296,22.298 46.296,21.899 48.015,20.18 48.015,14.316 55.952,6.379 v1(55.952,2.142)
  Bottom Layer w0.102: BTB_3.54@55.946,0.834 v1@55.946,2.137
GPIO1_A7: BTB_3.46 U8.C25 | length 23.1
  Bottom Layer w0.102: v1(45.087,23.69) 45.126,23.652 45.126,23.333 45.177,23.282 45.177,23.003 45.453,22.727 45.453,22.01 46.011,21.453 47.866,19.598 47.866,14.123 55.455,6.533 BTB_3.46@55.455,4.843
GPIO1_B0: BTB_3.42 U8.C27 | length 22
  Bottom Layer w0.102: v1(44.167,22.831) 44.167,22.748 43.987,22.568 43.987,22.215 44.65,21.552 44.667,21.552 45.389,20.83 46.649,19.57 46.649,13.363 53.455,6.557 BTB_3.42@53.455,4.843
GPIO1_B1: BTB_3.47 U8.D25 | length 24
  Bottom Layer w0.102: v1(44.972,24.184) 45.032,24.124 45.214,24.124 45.482,23.857 45.482,22.971 45.646,22.807 45.646,22.105 46.154,21.596 48.148,19.603 48.148,14.349 55.955,6.541 BTB_3.47@55.955,4.843
GPIO1_C0: BTB_3.32 U8.G29 | length 25
  Top Layer w0.102: U8.G29@41.671,23.714 42.157,23.714 42.586,23.285 v1(42.586,23.267)
  Bottom Layer w0.102: v1(42.586,23.267) 42.568,23.285 41.095,23.285 41.036,23.226 41.036,20.378 41.046,20.367 41.046,18.989 41.695,18.339 42.409,18.339 42.414,18.344 42.902,18.344 43.127,18.344 43.845,17.627 43.845,11.824 48.431,7.238 BTB_3.32@48.431,4.867
GPIO1_C1: BTB_3.30 U8.G27 | length 24.6
  Bottom Layer w0.102: v1(42.515,24.737) 42.432,24.737 42.328,24.633 42.317,24.633 41.578,23.894 41.124,23.894 40.649,23.419 40.649,20.218 40.66,20.207 40.66,18.675 41.396,17.938 41.77,17.938 42.496,17.938 42.753,17.938 43.372,17.319 43.372,11.174 47.431,7.115 BTB_3.30@47.431,4.867
GPIO1_C4: BTB_3.35 U8.E30 | length 21.8
  Bottom Layer w0.114: v1@42.232,22.248 v1@42.285,22.195 ; v1@42.26,22.269 42.255,22.273 41.858,22.273 41.582,21.997 41.582,21.626 41.923,21.284 42.661,20.546 43.25,20.546 44.452,19.345 44.452,12.119 49.931,6.64 BTB_3.35@49.931,4.867
  other v1: 42.234,22.281
GPIO1_C6: BTB_3.39 R49.1 U8.D29 | length 45.1
  Top Layer w0.102: v1(56.097,8.452) 56.099,8.452 56.56,8.913 59.914,8.913 59.917,8.911 69.948,8.911 70.309,9.271 70.309,11.16 R49.1@69.438,12.031
  Layer 4 w0.102: v1(52.271,6.147) 52.6,6.147 54.905,8.452 v1(56.097,8.452)
  Bottom Layer w0.102: v1(43.067,22.392) 43.067,22.309 43.222,22.153 43.222,22.112 44.478,20.856 44.478,20.842 45.651,19.67 45.651,12.802 51.955,6.498 BTB_3.39@51.955,4.867 ; BTB_3.39@51.931,4.843 BTB_3.39@51.955,4.867 ; v1(52.271,6.147) 52.005,5.881 52.005,4.917 BTB_3.39@51.955,4.867
GPIO1_D3: BTB_3.40 U8.E28 | length 22.5
  Bottom Layer w0.102: v1(43.368,23.271) 43.355,23.271 43.136,23.052 43.136,22.847 43.415,22.568 43.415,22.192 43.987,21.62 44.006,21.62 45.092,20.534 45.996,19.63 45.996,12.975 52.629,6.343 52.629,5.916 52.455,5.742 BTB_3.40@52.455,4.843
GPIO1_D5: BTB_3.29 U8.G26 | length 25.5
  Bottom Layer w0.102: v1(43.027,25.033) 42.968,25.093 42.769,25.093 42.758,25.104 42.061,25.104 40.293,23.336 40.293,22.564 40.456,22.401 40.456,18.311 41.033,17.735 41.973,17.735 42.293,17.735 42.427,17.735 43.098,17.064 43.098,11.041 46.931,7.208 BTB_3.29@46.931,4.867
GPIO2_C5: BTB_3.8 U8.AE30 | length 40.2
  Layer 4 w0.102: v1(32.776,31.497) 32.814,31.497 33.385,30.926 33.385,30.529 33.248,30.391 32.008,30.391 31.83,30.213 31.83,27.877 31.83,27.419 31.401,26.99 29.016,26.99 26.202,24.176 26.202,14.887 28.413,12.676 34.152,12.676 36.782,10.046 36.782,6.966 36.174,6.358 v1(36.102,6.358)
  Bottom Layer w0.102: v1(36.102,6.358) 36.455,6.006 BTB_3.8@36.455,4.843
GPIO3_A6: BTB_2.89 U8.AH27 | length 45.1
  Bottom Layer w0.114: BTB_2.89@9.551,62.92 9.551,61.237 10.913,59.876 12.643,59.876 12.882,59.637 14.252,59.637 14.895,58.994 15.774,58.994 17.624,58.995 20.789,55.83 22.156,55.83 29.077,48.908 29.077,37.031 29.077,34.845 30.16,33.762 32.475,33.762 33.033,34.32 v1(33.069,34.32)
GPIO3_B2: BTB_3.4 U8.AE28 | length 41.8
  Layer 4 w0.102: v1(33.829,32.475) 31.702,32.475 30.944,31.717 30.944,28.763 30.944,28.286 30.456,27.798 28.694,27.798 25.416,24.52 25.416,14.799 28.148,12.066 33.612,12.066 35.935,9.743 35.935,9.116 35.249,8.431 35.249,7.592 35.069,7.412 35.069,7.34 34.844,7.115 v1(34.844,7.059)
  Bottom Layer w0.102: BTB_3.4@34.455,4.843 34.455,6.05 34.208,6.297 34.208,6.551 34.491,6.834 34.563,6.834 34.788,7.059 v1(34.844,7.059)
GPIO3_C0: BTB_1.46 U8.Y29 | length 35.1
  Bottom Layer w0.102: BTB_1.46@26.551,4.843 26.551,10.474 23.342,13.683 23.342,23.734 24.48,24.872 24.698,24.872 28.577,28.751 30.957,28.751 33.192,28.751 33.242,28.801 33.282,28.801 33.58,29.1 33.877,29.1 34.387,29.61 34.387,29.666 34.538,29.817 35,29.817 35.132,29.685 35.216,29.685 35.268,29.737 35.31,29.694 35.53,29.694 v1(35.589,29.635)
GPIO3_D5: BTB_3.5 U8.AB28 | length 43
  Layer 4 w0.102: v1(34.844,6.348) 34.844,6.379 35.081,6.616 35.081,6.688 35.63,7.237 35.63,8.304 36.155,8.828 36.155,9.81 33.696,12.269 28.233,12.269 25.619,14.883 25.619,24.343 28.823,27.547 30.751,27.547 31.292,28.088 31.292,28.415 31.292,31.667 31.798,32.172 33.542,32.172 34.322,31.392 34.913,31.392 35.114,31.192 v1(35.197,31.192)
  Bottom Layer w0.102: v1(34.844,6.348) 34.903,6.289 34.903,6.106 34.955,6.054 BTB_3.5@34.955,4.843
GPIO4_A3: BTB_2.81 U8.AL29 | length 38
  Top Layer w0.114: v1(30.318,34.759) 30.325,34.752 30.633,34.752 U8.AL29@30.64,34.745
  Bottom Layer w0.102: BTB_2.81@13.551,62.92 13.551,61.768 15.38,59.939 18.346,59.939 20.876,57.409 22.307,57.409 29.999,49.717 29.999,37.953 29.999,35.078 v1(30.318,34.759)
GPIO4_B1: BTB_2.65 U8.AL24 | length 31.8
  Bottom Layer w0.102: 21.876,60.836 23.212,60.836 32.671,51.377 32.671,40.625 32.671,40.178 33.337,39.513 33.337,37.343 v1(32.935,36.941)
  Bottom Layer w0.114: BTB_2.65@21.551,62.92 21.551,61.161 21.876,60.836
GPIO4_C6: BTB_1.65 U8.AF33 | length 43.8
  Top Layer w0.102: v1(21.541,2.288) 21.541,1.882 21.907,1.515 22.746,1.515 22.923,1.693 22.923,2.277 22.695,2.506 22.415,2.506 22.238,2.684 22.238,3.572 19.413,6.398 19.413,21.893 19.413,27.14 20.419,28.146 22.153,29.881 30.495,29.881 30.519,29.856 30.761,29.856 31.099,30.195 U8.AF33@31.099,30.608
  Bottom Layer w0.156: BTB_1.65@21.535,0.98 v1@21.535,2.282
HDMI_TX0_CEC_M0: BTB_2.66 U8.AK24 | length 32.6
  Bottom Layer w0.102: 21.839,60.399 23.065,60.399 32.372,51.092 32.372,40.325 32.372,36.985 32.782,36.574 33.087,36.574 33.105,36.592 33.341,36.592 v1(33.4,36.651)
  Bottom Layer w0.114: BTB_2.66@21.051,62.92 21.051,61.187 21.839,60.399
HDMI_TX0_D0N: BTB_4.37 U8.AJ1 | length 25
  Top Layer w0.109: U8.AJ1@44.428,46.695 44.428,46.707 44.281,46.854 44.281,46.945 44.528,47.192 44.528,48.319 44.144,48.703 44.144,54.245 50.781,60.882 50.842,60.943 50.842,61.174 50.923,61.255 51.042,61.255 51.276,61.49 51.276,62.085 51.042,62.319 50.811,62.319 50.73,62.4 50.73,62.779 50.811,62.86 51.042,62.86 51.276,63.094 51.276,63.689 51.042,63.923 50.923,63.923 50.842,64.004 50.842,64.135 50.921,64.214 51.155,64.214 51.218,64.278 51.218,64.419 51.155,64.483 50.99,64.483 50.926,64.547 50.926,64.854 v1@50.929,64.857 ; v1@50.947,64.839 v1(50.947,64.92)
  Bottom Layer w0.109: BTB_4.37@50.931,66.793 50.931,64.936 v1(50.947,64.92)
HDMI_TX0_D0P: BTB_4.36 U8.AJ2 | length 24.9
  Top Layer w0.109: U8.AJ2@43.969,46.235 43.969,47.002 44.267,47.3 44.267,48.21 43.883,48.594 43.883,54.353 50.414,60.884 50.581,61.051 50.581,61.283 50.815,61.517 50.934,61.517 51.015,61.598 51.015,61.976 50.934,62.058 50.702,62.058 50.468,62.292 50.468,62.887 50.702,63.121 50.934,63.121 51.015,63.202 51.015,63.581 50.934,63.662 50.815,63.662 50.581,63.896 50.581,64.135 50.581,64.662 50.395,64.848 v1(50.395,64.916)
  Bottom Layer w0.109: v1(50.395,64.916) 50.431,64.952 BTB_4.36@50.431,66.793
HDMI_TX0_D1N: BTB_4.35 U8.AK2 | length 24.9
  Top Layer w0.109: U8.AK2@43.509,46.695 43.546,46.732 43.546,46.862 43.665,46.982 44.066,47.383 44.066,47.845 43.672,48.239 43.672,49.241 43.466,49.447 43.466,49.876 43.466,50.471 43.547,50.552 43.577,50.552 43.658,50.633 43.658,51.012 43.577,51.093 43.547,51.093 43.466,51.174 43.466,51.553 43.547,51.634 43.577,51.634 43.658,51.715 43.658,52.093 43.577,52.174 43.547,52.174 43.466,52.256 43.466,52.634 43.547,52.715 43.577,52.715 43.658,52.796 43.658,53.175 43.577,53.256 43.547,53.256 43.466,53.337 43.466,53.731 43.466,54.428 49.757,60.719 49.801,60.763 49.801,61.652 49.882,61.733 49.95,61.733 50.184,61.968 50.184,62.563 49.95,62.797 49.721,62.797 49.64,62.878 49.64,63.256 49.721,63.338 49.95,63.338 50.184,63.572 50.184,64.167 49.95,64.401 49.882,64.401 49.801,64.482 49.801,64.881 49.801,65.181 49.796,65.186 49.796,65.277 49.942,65.423 v1(49.942,65.491)
  Bottom Layer w0.109: v1@49.931,65.502 BTB_4.35@49.931,66.793
HDMI_TX0_D1P: BTB_4.34 U8.AK3 | length 24.9
  Top Layer w0.109: U8.AK3@43.048,46.236 43.086,46.273 43.086,46.772 43.557,47.243 43.805,47.491 43.805,47.737 43.411,48.131 43.411,49.132 43.205,49.339 43.205,54.536 49.388,60.719 49.539,60.871 49.539,61.76 49.774,61.995 49.842,61.995 49.923,62.076 49.923,62.454 49.842,62.535 49.613,62.535 49.378,62.77 49.378,63.365 49.613,63.599 49.842,63.599 49.923,63.68 49.923,64.059 49.842,64.14 49.774,64.14 49.539,64.374 49.539,64.881 49.539,65.073 49.535,65.078 49.535,65.231 49.391,65.374 v1@49.391,65.465
  Bottom Layer w0.109: v1@49.406,65.479 BTB_4.34@49.406,66.79
  other v1: 49.372,65.454
HDMI_TX0_D2N: BTB_4.33 U8.AL1 | length 24.9
  Top Layer w0.109: U8.AL1@43.509,47.614 43.503,47.608 43.241,47.608 43.177,47.672 43.177,48.816 42.798,49.195 42.798,49.604 42.798,50.199 42.879,50.28 42.881,50.28 42.962,50.361 42.962,50.74 42.881,50.821 42.879,50.821 42.798,50.902 42.798,51.281 42.879,51.362 42.881,51.362 42.962,51.443 42.962,51.822 42.881,51.903 42.879,51.903 42.798,51.984 42.798,52.354 42.798,54.616 48.836,60.653 48.836,60.856 48.836,61.096 48.619,61.312 48.479,61.312 48.424,61.367 48.424,61.621 48.479,61.675 48.869,61.675 49.077,61.883 49.077,62.354 48.869,62.561 48.479,62.561 48.424,62.616 48.424,62.87 48.479,62.924 48.869,62.924 49.077,63.132 49.077,63.602 48.869,63.81 48.479,63.81 48.424,63.864 48.424,64.118 48.479,64.173 48.619,64.173 48.836,64.39 48.836,64.655 48.836,64.728 48.947,64.839 v1(48.947,64.92)
  Bottom Layer w0.109: v1@48.931,64.936 48.931,65.496 BTB_4.33@48.931,66.793
HDMI_TX0_D2P: BTB_4.32 U8.AL2 | length 24.9
  Top Layer w0.109: U8.AL2@43.05,47.154 43.056,47.161 43.056,47.423 42.916,47.563 42.916,48.708 42.537,49.087 42.537,54.724 48.574,60.762 48.574,60.856 48.574,60.987 48.51,61.051 48.37,61.051 48.163,61.259 48.163,61.729 48.37,61.937 48.761,61.937 48.815,61.991 48.815,62.245 48.761,62.3 48.37,62.3 48.163,62.507 48.163,62.978 48.37,63.185 48.761,63.185 48.815,63.24 48.815,63.494 48.761,63.548 48.37,63.548 48.163,63.756 48.163,64.227 48.37,64.434 48.51,64.434 48.574,64.498 48.574,64.655 48.574,64.679 48.415,64.838 v1(48.415,64.916)
  Bottom Layer w0.109: v1(48.415,64.916) 48.431,64.932 48.431,65.289 BTB_4.32@48.431,66.793
HDMI_TX0_D3N: BTB_4.39 U8.AH2 | length 24.8
  Top Layer w0.109: U8.AH2@44.429,45.775 44.429,45.824 45,46.396 45,48.748 44.812,48.936 44.812,54.085 51.826,61.099 51.826,63.602 51.826,64.197 51.908,64.278 52.127,64.278 52.208,64.359 52.208,64.738 52.127,64.819 51.908,64.819 51.826,64.9 51.826,65.294 51.917,65.385 51.942,65.409 v1(51.942,65.491)
  Bottom Layer w0.109: v1@51.931,65.502 BTB_4.39@51.931,66.793
HDMI_TX0_D3P: BTB_4.38 U8.AH3 | length 24.8
  Top Layer w0.109: U8.AH3@43.969,45.316 44.006,45.354 44.006,45.557 44.133,45.684 44.133,45.898 44.739,46.504 44.739,47.481 44.739,48.64 44.551,48.828 44.551,54.193 51.565,61.207 51.565,65.227 51.391,65.401 v1(51.391,65.465)
  Bottom Layer w0.109: v1@51.406,65.479 BTB_4.38@51.406,66.79
HDMI_TX0_HPD_M0: BTB_3.56 U8.B26 | length 26
  Top Layer w0.156: U8.B26@45.348,22.794 45.348,22.287 45.439,22.195 45.48,22.195 45.667,22.008 45.667,21.798 47.274,20.191 47.274,13.859 54.952,6.18 v1(54.952,2.142)
  Bottom Layer w0.102: BTB_3.56@54.946,0.834 v1@54.946,2.137
HDMI_TX0_SBDN: BTB_4.42 U8.AG1 | length 25
  Top Layer w0.109: U8.AG1@45.348,45.776 45.384,45.812 45.384,46.082 45.473,46.17 45.473,53.755 53.311,61.594 53.311,62.952 53.311,63.547 53.393,63.628 53.614,63.628 53.695,63.709 53.695,64.088 53.614,64.169 53.393,64.169 53.311,64.25 53.311,64.791 53.311,65.257 53.441,65.386 v1(53.441,65.468)
  Bottom Layer w0.109: BTB_4.42@53.431,66.793 53.436,66.788 53.436,65.472 v1(53.441,65.468)
HDMI_TX0_SBDP: BTB_4.41 U8.AG2 | length 24.9
  Top Layer w0.109: U8.AG2@44.888,45.316 44.888,45.956 45.211,46.279 45.211,47.008 45.211,53.863 53.05,61.702 53.05,65.239 52.915,65.374 v1(52.915,65.454)
  Bottom Layer w0.109: v1(52.915,65.454) 52.923,65.461 52.923,66.785 BTB_4.41@52.931,66.793
HDMI_TX0_SCL_M0: BTB_2.79 U8.AJ28 | length 38.7
  Bottom Layer w0.102: BTB_2.79@14.551,62.92 14.599,62.872 14.599,61.059 15.446,60.212 18.609,60.212 21.107,57.714 22.554,57.714 30.266,50.003 30.266,38.22 30.266,35.545 31.294,34.517 31.951,34.517 v1(31.961,34.527)
HDMI_TX0_SDA_M0: BTB_2.88 U8.AJ25 | length 45.8
  Bottom Layer w0.114: 10.039,61.621 11.474,60.186 12.638,60.186 12.951,59.873 14.678,59.873 15.222,59.33 17.883,59.33 21.105,56.108 22.511,56.108 29.372,49.248 29.372,37.326 29.372,34.842 30.246,33.968 32.389,33.968 32.704,34.283 32.704,34.455 33.56,35.312 33.56,35.634 v1(33.614,35.688) ; 10.045,61.627 BTB_2.88@10.045,62.914
HDMI_TX1_CEC_M0: BTB_3.7 U8.AC30 | length 41.7
  Layer 4 w0.102: v1(33.806,30.608) 33.828,30.631 33.828,30.978 32.874,31.933 32.317,31.933 31.599,31.216 31.599,28.108 31.599,27.57 31.269,27.239 28.882,27.239 25.897,24.255 25.897,14.905 28.329,12.473 34.067,12.473 36.561,9.979 36.561,7.558 v1(36.088,7.084)
  Bottom Layer w0.102: BTB_3.7@35.955,4.843 35.955,5.718 35.658,6.014 35.658,6.655 v1(36.088,7.084)
HDMI_TX1_D0N: BTB_4.25 U8.AP4 | length 23.3
  Top Layer w0.109: U8.AP4@40.752,47.614 40.74,47.614 40.592,47.467 40.502,47.467 40.269,47.699 40.269,47.959 40.271,47.96 40.271,53.479 40.855,54.063 40.855,55.566 45.751,60.462 45.751,61.062 45.751,61.657 45.832,61.738 45.985,61.738 46.066,61.819 46.066,62.198 45.985,62.279 45.829,62.279 45.748,62.36 45.748,62.739 45.829,62.82 45.985,62.82 46.066,62.901 46.066,63.28 45.985,63.361 45.832,63.361 45.751,63.442 45.751,64.028 45.751,64.048 44.946,64.853 44.946,64.96 44.787,65.119 44.787,65.276 44.942,65.431 v1(44.942,65.491)
  Bottom Layer w0.109: v1@44.931,65.502 BTB_4.25@44.931,66.793
HDMI_TX1_D0P: BTB_4.24 U8.AN4 | length 23.3
  Top Layer w0.109: U8.AN4@41.211,47.154 40.445,47.154 40.008,47.591 40.008,47.959 40.007,47.96 40.007,53.588 40.591,54.172 40.591,55.676 45.487,60.572 45.487,63.939 44.681,64.744 44.681,64.851 44.523,65.009 44.523,65.239 44.368,65.394 v1(44.368,65.454)
  Bottom Layer w0.109: v1@44.406,65.479 BTB_4.24@44.406,66.79
HDMI_TX1_D1N: BTB_4.23 U8.AN5 | length 23.3
  Top Layer w0.109: U8.AN5@40.752,46.695 40.715,46.732 40.584,46.732 39.731,47.585 39.731,53.868 40.182,54.319 40.182,55.724 43.774,59.316 43.774,60.518 43.774,61.114 43.855,61.195 44.27,61.195 44.352,61.276 44.352,61.654 44.27,61.736 43.855,61.736 43.774,61.817 43.774,62.147 43.774,64.318 43.895,64.44 v1(43.895,64.521)
  Bottom Layer w0.109: v1(43.895,64.521) 43.927,64.553 43.927,65.296 43.931,65.299 BTB_4.23@43.931,66.793
HDMI_TX1_D1P: BTB_4.22 U8.AM5 | length 23.3
  Top Layer w0.109: U8.AM5@41.2,46.22 41.148,46.272 40.674,46.272 39.469,47.477 39.469,53.976 39.92,54.427 39.92,55.832 43.512,59.424 43.512,61.445 43.512,63.231 43.512,64.229 43.391,64.351 v1(43.391,64.432)
  Bottom Layer w0.109: v1(43.391,64.432) 43.391,65.467 43.431,65.507 BTB_4.22@43.431,66.793